# Altium PCB PCB_7000_0303_Rev13.PcbDoc (part 2 of 3)
Units mil, origin at the board's own origin, x right, y up, seen from the top; angles counter-clockwise.
Board outline 6252 x 3995 mil, 4 copper layers (Top Layer, Power, GND, Bottom Layer), stack 62.449 mil thick; 124 components, 105 nets, 610 pads, 262 vias.
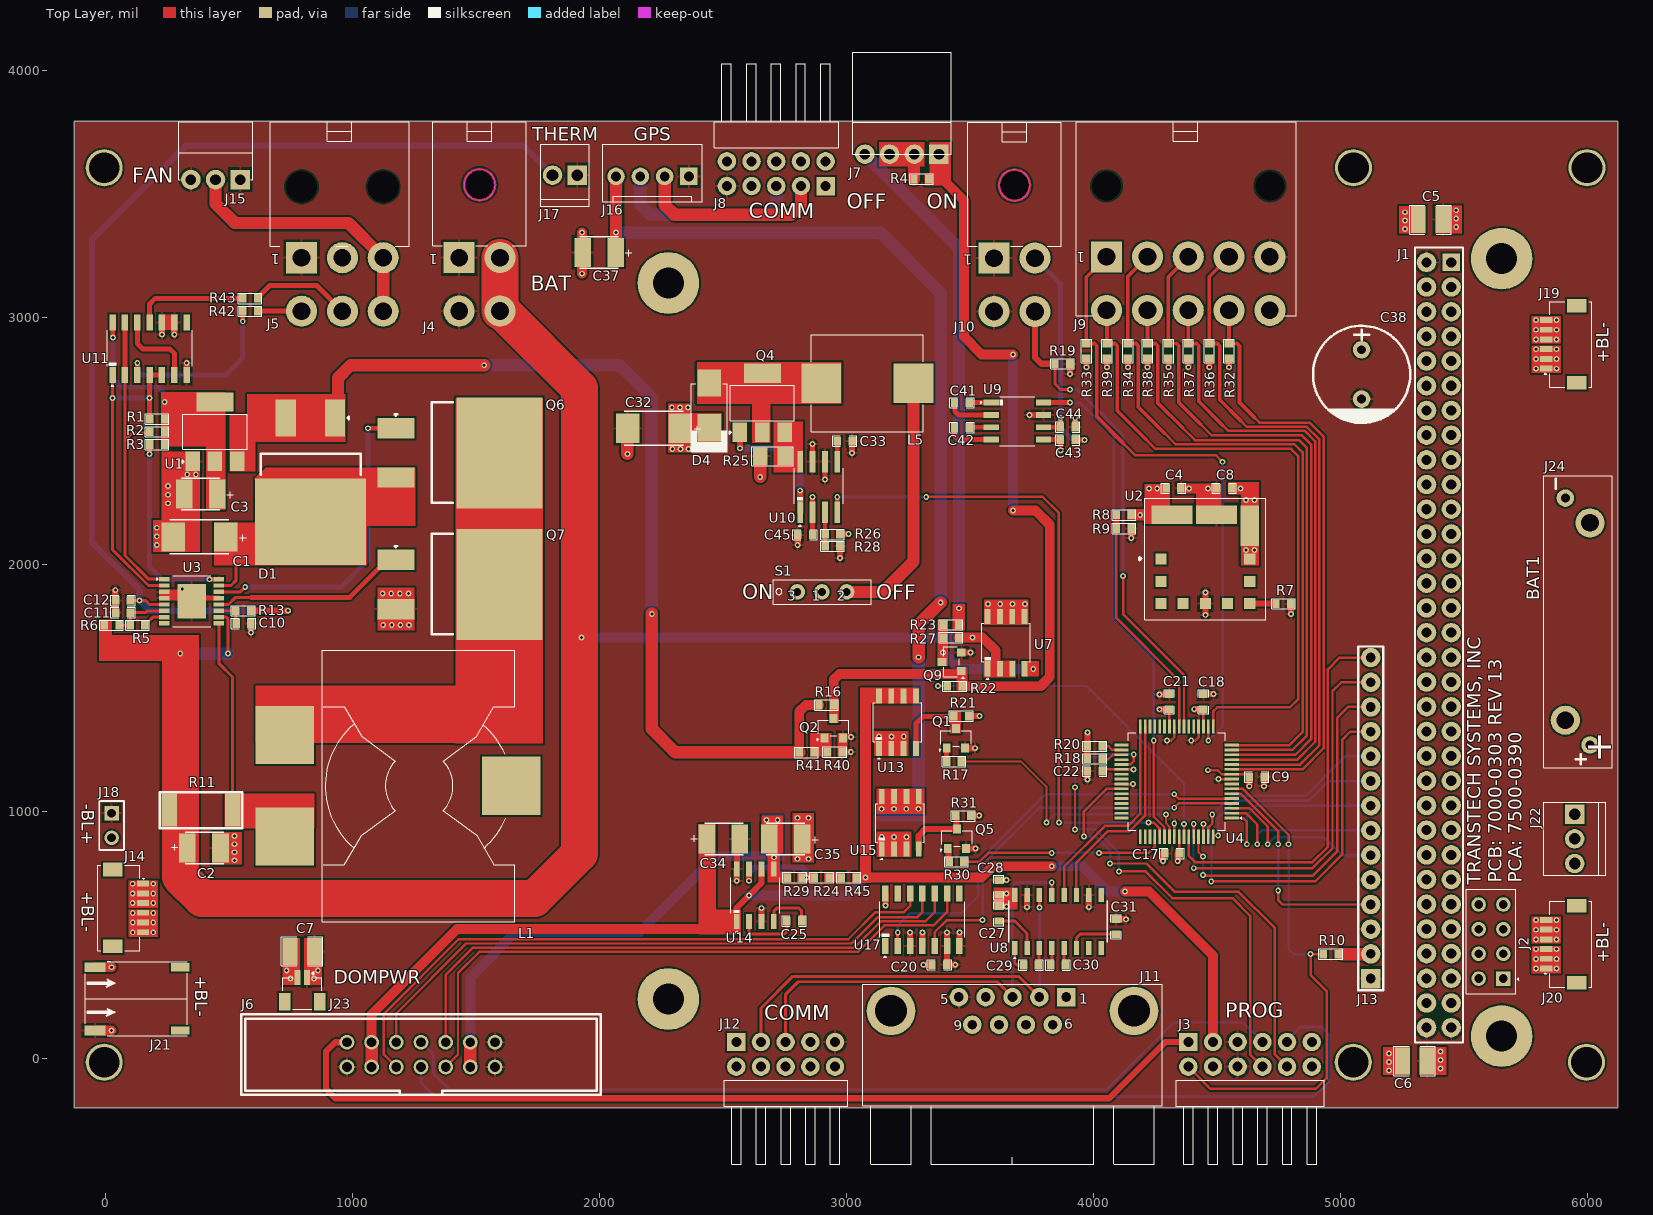
[diagram p0: Top Layer view]

## Part data (continued)
J14 J19 J20: "CONN HEADER SMD R/A 6POS 1MM", LCSC Part Number=C265110, Manufacturer=JST, Supplier Part Number=3248077, ComponentLink1Description=https://datasheet.ciiva.com/16213/sm06b-shls-tflfsn-16213701.pdf?src-supplier=Future+Electronics, ComponentLink1URL=https://datasheet.ciiva.com/16213/sm06b-shls-tflfsn-16213701.pdf?src-supplier=Future+Electronics, Item Type="Headers and Wire Housings", Manufacturer Part Number=SM06B-SHLS-TF(LF)(SN), Number of Contacts=6NUMBER, Pricing="4500=0.375 (USD)", RoHS=Yes, Stock=18000, Supplier="Future Electronics"
J15: "CONN HEADER R/A 3POS 2.54MM", Manufacturer=Molex, Supplier Part Number=538-22-05-3031, Item Type="Headers, Male Pins", Manufacturer Part Number=0022053031, Pricing="1=0.48, 10=0.423, 50=0.423, 100=0.349, 1000=0.25, 10000=0.205 (USD)", RoHS=Yes, Stock=22393, Supplier=Mouser
J16: "1x4P 1 2.54mm Male pin 4 -25℃~+85℃ 3A Straight Plugin,P=2.54mm Wire To Board / Wire To Wire Connector ROHS", LCSC Part Number=C2764792, Manufacturer=XFCN, Package=Plugin,P=2.54mm, ComponentLink1Description=LCSC, ComponentLink1URL=https://www.lcsc.com/product-detail/Wire-To-Board-Wire-To-Wire-Connector_XFCN-M2510V-04P_C2764792.html, Item Type="Wire To Board Connector", Manufacturer Part Number=M2510V-04P
J17: "CONN HEADER VERT 2POS 2.54MM", LCSC Part Number=C505162, Manufacturer=Molex, Supplier Part Number=538-22-11-2022, ComponentLink1Description=https://www.molex.com/pdm_docs/sd/022112022_sd.pdf?src-supplier=Digikey, ComponentLink1URL=https://www.molex.com/pdm_docs/sd/022112022_sd.pdf?src-supplier=Digikey, Item Type="Headers, Male Pins", Manufacturer Part Number=0022112022, Pricing="1=0.4, 10=0.274, 50=0.274, 100=0.216, 1000=0.177, 10000=0.169 (USD)", RoHS=Yes, Stock=67872, Supplier=Mouser
J18: "2.54mm Plugin 3A 2P Straight 1x2P 8.5mm Top Square Holes Plugin,P=2.54mm Female Headers ROHS", LCSC Part Number=C2935973, Manufacturer=DEALON, Package=Plugin,P=2.54mm, ComponentLink1Description=LCSC, ComponentLink1URL=https://www.lcsc.com/product-detail/span-style-background-color-ff0-Female-span-Headers_DEALON-DM254R-11-02-85_C2935973.html, Item Type=Header, Manufacturer Part Number=DM254R-11-02-85
J21: "CONN HEADER SMD R/A 2POS 3.5MM", LCSC Part Number=C485339, Manufacturer=JST, Supplier Part Number=5605704, ComponentLink1Description=https://datasheet.ciiva.com/26894/getdatasheetpartid-651429-26894666.pdf?src-supplier=Verical, ComponentLink1URL=https://datasheet.ciiva.com/26894/getdatasheetpartid-651429-26894666.pdf?src-supplier=Verical, ComponentLink2Description=https://datasheet.ciiva.com/16394/sm02b-bhss-1-tblfsn-16394674.pdf?src-supplier=Future+Electronics, ComponentLink2URL=https://datasheet.ciiva.com/16394/sm02b-bhss-1-tblfsn-16394674.pdf?src-supplier=Future+Electronics, Item Type="Headers and Wire Housings", Manufacturer Part Number=SM02B-BHSS-1-TB(LF)(SN), Pricing="1000=0.67, 2000=0.655, 3000=0.645, 4000=0.635 (USD)", RoHS=Yes, Stock=10000, Supplier="Future Electronics"
J22: "CONN HEADER VERT 3POS 2.54MM", LCSC Part Number=C505163, Manufacturer=Molex, Supplier Part Number=538-22-11-2032, ComponentLink1Description=https://www.molex.com/pdm_docs/sd/022112032_sd.pdf?src-supplier=Digikey, ComponentLink1URL=https://www.molex.com/pdm_docs/sd/022112032_sd.pdf?src-supplier=Digikey, Item Type="Headers, Male Pins", Manufacturer Part Number=0022112032, Pricing="1=0.68, 10=0.599, 50=0.599, 100=0.494, 1000=0.354, 10000=0.311 (USD)", RoHS=Yes, Stock=32037, Supplier=Mouser
J23: "CONN HEADER SMD 2POS 1MM", Housing Color=50Colour, LCSC Part Number=C160388, Manufacturer=JST, Supplier Part Number=9104290, ComponentLink1Description=https://datasheet.ciiva.com/8052/91630-8052077.pdf?src-supplier=Element14, ComponentLink1URL=https://datasheet.ciiva.com/8052/91630-8052077.pdf?src-supplier=Element14, ComponentLink2Description=https://datasheet.ciiva.com/16351/bm02b-srss-tb-lf-sn-16351949.pdf?src-supplier=Future+Electronics, ComponentLink2URL=https://datasheet.ciiva.com/16351/bm02b-srss-tb-lf-sn-16351949.pdf?src-supplier=Future+Electronics, Gender=29Gender, Housing Material=4261ConductorMaterial, Item Type=Connectors, Lead Free=5697LeadFree, Manufacturer Part Number=BM02B-SRSS-TB(LF)(SN), Orientation=5495OrientationType, Pricing="1=0.198 (USD)", RoHS=Yes, Stock=597, Supplier="Future Electronics"
J24: "Coin Cell Battery Holders VERT HOLDER FOR OR CR2477N", Manufacturer=Renata, Supplier Part Number=3698206, ComponentLink1Description=https://datasheet.ciiva.com/16990/nh5077-lf-16990158.pdf?src-supplier=Future+Electronics, ComponentLink1URL=https://datasheet.ciiva.com/16990/nh5077-lf-16990158.pdf?src-supplier=Future+Electronics, ComponentLink2Description=https://datasheet.ciiva.com/1391/35241-1391061.pdf?src-supplier=Element14, ComponentLink2URL=https://datasheet.ciiva.com/1391/35241-1391061.pdf?src-supplier=Element14, ComponentLink3Description=https://datasheet.ciiva.com/12342/nh5077-lf-29240-12342970.pdf?src-supplier=Mouser, ComponentLink3URL=https://datasheet.ciiva.com/12342/nh5077-lf-29240-12342970.pdf?src-supplier=Mouser, Item Type="Batteries and Accessories", Manufacturer Part Number=NH5077-LF, Pricing="50=1.72, 200=1.68, 750=1.63, 1500=1.61, 3750=1.56 (USD)", RoHS=Yes, Stock=477, Supplier="Future Electronics"
L1: "28A 4.7uH ±20% 61.2A 2.6mΩ SMD-3P,19.7x27.9mm Inductors (SMD) ROHS", LCSC Part Number=C2761984, Manufacturer=KOHERelec, Package=SMD-3P,19.7x27.9mm, ComponentLink1Description=LCSC, ComponentLink1URL=https://www.lcsc.com/product-detail/Inductors-SMD_KOHERelec-THC2818-4R7M_C2761984.html, Item Type=Inductors, Manufacturer Part Number=THC2818-4R7M
L5: library part SMMS1050-470M, "3A 47uH Molding Choke ±20% 4.5A SMD Power Inductors ROHS", LCSC Part Number=C149548, Manufacturer=SXN, ComponentLink1Description=LCSC, ComponentLink1URL=https://www.lcsc.com/product-detail/Power-Inductors_SXN-Shun-Xiang-Nuo-Elec-SMMS1050-470M_C149548.html, Manufacturer Part Number=SMMS1050-470M
Q1 Q2 Q5 Q9: "TRANS NPN 40V 0.6A SMD SOT23-3", Case/Package=SOT-23, Collector Base Voltage (VCBO)=75V, Collector Emitter Breakdown Voltage=40V, Collector Emitter Saturation Voltage=1V, Continuous Collector Current=600mA, Current=1A, Emitter Base Voltage (VEBO)=6V, Frequency=300MHz, LCSC Part Number=C94515, Manufacturer=Diodes, Max Operating Temperature=150°C, Max Power Dissipation=300mW, Min Operating Temperature=-55°C, Package Quantity=3000, Power Dissipation=350mW, Supplier Part Number 1=MMBT2222A-FDIDKR-ND, Collector Emitter Voltage (VCEO)=40V, ComponentLink1Description=http://www.diodes.com/datasheets/ds30041.pdf?src-supplier=Future+Electronics, ComponentLink1URL=http://www.diodes.com/datasheets/ds30041.pdf?src-supplier=Future+Electronics, ComponentLink2Description=http://www.diodes.com/datasheets/ds30041.pdf?src-supplier=Avnet, ComponentLink2URL=http://www.diodes.com/datasheets/ds30041.pdf?src-supplier=Avnet, ComponentLink3Description=https://www.verical.com/server-webapp/html/getDatasheet?partID=82692&src-supplier=Verical, ComponentLink3URL=https://www.verical.com/server-webapp/html/getDatasheet?partID=82692&src-supplier=Verical, ComponentLink4Description=https://www.diodes.com/assets/Datasheets/ds30041.pdf?src-supplier=Digi-Key, ComponentLink4URL=https://www.diodes.com/assets/Datasheets/ds30041.pdf?src-supplier=Digi-Key, ComponentLink5Description=http://www.diodes.com/datasheets/ds30041.pdf?src-supplier=Avnet+Europe, ComponentLink5URL=http://www.diodes.com/datasheets/ds30041.pdf?src-supplier=Avnet+Europe, ComponentLink6Description=http://www.diodes.com/datasheets/ds30041.pdf?src-supplier=Element14, ComponentLink6URL=http://www.diodes.com/datasheets/ds30041.pdf?src-supplier=Element14, Contact Plating=Matte,Tin, Current Rating=600mA, Element Configuration=Single, Gain Bandwidth Product=300MHz, Height=1mm, hFE Min=100, Item Type=Mosfet, Lead Free="Lead Free", Length=3.05mm, Manufacturer Part Number=MMBT2222A-7-F, Max Breakdown Voltage=40V, Max Collector Current=600mA, Max Frequency=300MHz, Mount="Surface Mount", Number of Elements=1, Number of Pins=3, Packaging="Tape and Reel", Polarity=NPN, Pricing 1="1=0.15, 10=0.134, 100=0.0729, 500=0.04486, 1000=0.03059 (USD)", Radiation Hardening=No, REACH SVHC="No SVHC", Stock 1=2471182, Supplier 1=Digi-Key, Termination=SMD/SMT, Transition Frequency=300MHz, Voltage=40V, Voltage Rating (DC)=40V, Weight=0.000282oz, Width=1.4mm
Q4: "60V 4A 1PCSNChannel SOT-223 MOSFETs ROHS", LCSC Part Number=C7494559, Manufacturer="VBsemi Elec", Package=SOT-223, ComponentLink1Description=LCSC, ComponentLink1URL=https://www.lcsc.com/product-detail/MOSFETs_VBsemi-Elec-NTF3055L175T1G-VB_C7494559.html, Item Type=MOSFET, Manufacturer Part Number=NTF3055L175T1G-VB
Q6: "MOSFET P-CH 60V 27A D2PAK", Manufacturer="ON Semiconductor / Fairchild", Supplier Part Number=FQB27P06TMCT-ND, ComponentLink1Description=https://datasheet.ciiva.com/6037/1781179-6037411.pdf?src-supplier=Farnell, ComponentLink1URL=https://datasheet.ciiva.com/6037/1781179-6037411.pdf?src-supplier=Farnell, ComponentLink2Description=https://datasheet.ciiva.com/15137/getdatasheetpartid-95969-15137803.pdf?src-supplier=Verical, ComponentLink2URL=https://datasheet.ciiva.com/15137/getdatasheetpartid-95969-15137803.pdf?src-supplier=Verical, ComponentLink3Description=https://datasheet.ciiva.com/4441/fqb27p06-109865-4441954.pdf?src-supplier=Mouser, ComponentLink3URL=https://datasheet.ciiva.com/4441/fqb27p06-109865-4441954.pdf?src-supplier=Mouser, ComponentLink4Description=https://datasheet.ciiva.com/1256/1729188-1256195.pdf?src-supplier=Newark, ComponentLink4URL=https://datasheet.ciiva.com/1256/1729188-1256195.pdf?src-supplier=Newark, ComponentLink5Description=https://datasheet.ciiva.com/6382/fqb27p06-6382008.pdf?src-supplier=Digikey, ComponentLink5URL=https://datasheet.ciiva.com/6382/fqb27p06-6382008.pdf?src-supplier=Digikey, ComponentLink6Description=https://datasheet.ciiva.com/6382/fqb27p06-6382011.pdf?src-supplier=Digikey, ComponentLink6URL=https://datasheet.ciiva.com/6382/fqb27p06-6382011.pdf?src-supplier=Digikey, ComponentLink7Description=https://datasheet.ciiva.com/22671/1781179-22671975.pdf?src-supplier=Element14, ComponentLink7URL=https://datasheet.ciiva.com/22671/1781179-22671975.pdf?src-supplier=Element14, Item Type=MOSFETs, Manufacturer Part Number=FQB27P06TM, Pricing="1=1.97, 10=1.634, 100=1.3003 (USD)", RoHS=Yes, Stock=2039, Supplier=Digikey
Q7: "MOSFET N-CH 60V 50A D2PAK", Current Rating=50A, LCSC Part Number=C472532, Manufacturer=STMicroelectronics, Supplier Part Number=511-STB55NF06, Voltage Rating (DC)=60V, ComponentLink1Description=https://datasheet.ciiva.com/4441/cd00002311-107743-4441381.pdf?src-supplier=Mouser, ComponentLink1URL=https://datasheet.ciiva.com/4441/cd00002311-107743-4441381.pdf?src-supplier=Mouser, ComponentLink2Description=https://datasheet.ciiva.com/17097/stb55nf06t4-17097567.pdf?src-supplier=Allied+Electronics, ComponentLink2URL=https://datasheet.ciiva.com/17097/stb55nf06t4-17097567.pdf?src-supplier=Allied+Electronics, ComponentLink3Description=https://datasheet.ciiva.com/16383/cd00002311-16383630.pdf?src-supplier=Future+Electronics, ComponentLink3URL=https://datasheet.ciiva.com/16383/cd00002311-16383630.pdf?src-supplier=Future+Electronics, ComponentLink4Description=https://datasheet.ciiva.com/938/cd00002311-938375.pdf?src-supplier=Digikey, ComponentLink4URL=https://datasheet.ciiva.com/938/cd00002311-938375.pdf?src-supplier=Digikey, ComponentLink5Description=https://datasheet.ciiva.com/938/cd00002311-938376.pdf?src-supplier=Digikey, ComponentLink5URL=https://datasheet.ciiva.com/938/cd00002311-938376.pdf?src-supplier=Digikey, Item Type=MOSFETs, Lead Free=5697LeadFree, Manufacturer Part Number=STB55NF06T4, Pricing="1=2.35, 10=1.97, 50=1.97, 100=1.58, 1000=1.1, 10000=1.05 (USD)", RoHS=Yes, Stock=5248, Supplier=Mouser
R1 R2 R3 R5 R8 R10 R13 R16 R21 R27 R28 R31 R32 R33 R34 R35 R36 R37 R38 R39 R40 R41 R45: library part RT0603BRD0710KL, "RES SMD 10K OHM 0.1% 1/10W 0603", Case/Package=0603, LCSC Part Number=C95204, Manufacturer=Yageo, Max Operating Temperature=155°C, Min Operating Temperature=-55°C, Package Height=0.45mm, Package Length=1.6mm, Package Style=SMTMeter, Package Width=0.8mm, Power=100mW, Rated Temperature=70°C, Resistor Type="FIXED RESISTOR", Supplier Part Number 1=1991391P, Temperature Coefficient=25ppm/°C, Tolerance=0.1%, Working Voltage=75V, Category="Chip SMD Resistors", ComponentLink1Description=https://datasheet.ciiva.com:443/pdfs/VipMasterIC/IC/YAGO/YAGO-S-A0008510989/YAGO-S-A0008510989-1.pdf?src-supplier=IHS+Markit, ComponentLink1URL=https://datasheet.ciiva.com:443/pdfs/VipMasterIC/IC/YAGO/YAGO-S-A0008510989/YAGO-S-A0008510989-1.pdf?src-supplier=IHS+Markit, ComponentLink2Description=https://datasheet.ciiva.com/5624/pyu-rt-1-to-0-05-rohs-l-4-5624351.pdf?src-supplier=Mouser, ComponentLink2URL=https://datasheet.ciiva.com/5624/pyu-rt-1-to-0-05-rohs-l-4-5624351.pdf?src-supplier=Mouser, ComponentLink3Description=https://datasheet.ciiva.com/29721/pyu-rt-1-to-0-05-rohs-l-4-29721177.pdf?src-supplier=Digi-Key, ComponentLink3URL=https://datasheet.ciiva.com/29721/pyu-rt-1-to-0-05-rohs-l-4-29721177.pdf?src-supplier=Digi-Key, Construction=Chip, Item Type=Resistor, Manufacturer Part Number=RT0603BRD0710KL, Mounting Technology="Surface Mount", Packaging="Tape and Reel", Pins=2, Pricing 1="100=0.29800, 250=0.27800, 500=0.25900, 1000=0.23700 (GBP)", Reach SVHC Compliant=Yes, RoHS=Yes, RoHS Compliant=Yes, Stock 1=20510, Supplier 1=Rs, Technology="THIN FILM", Termination=Wraparound
R4 R17 R18 R20 R22 R23 R30: library part RC0603FR-071KL, "RES SMD 1K OHM 1% 1/10W 0603", Case Code (Imperial)=0603, Case Code (Metric)=1608, LCSC Part Number=C22548, Manufacturer=Yageo, Max Operating Temperature=155°C, Min Operating Temperature=-55°C, Power Rating=100mW, Resistance=1kR, Supplier Part Number 1=311-1.00KHRDKR-ND, Temperature Coefficient=100ppm/°C, Tolerance=1%, Voltage Rating=50V, Case/Package=0603, ComponentLink1Description=https://www.verical.com/server-webapp/html/getDatasheet?partID=409289&src-supplier=Verical, ComponentLink1URL=https://www.verical.com/server-webapp/html/getDatasheet?partID=409289&src-supplier=Verical, ComponentLink2Description=http://documents.rs-components.com/techlib://itc_doclist_GB.htm?stockno=5048928&src-supplier=RSComponents, ComponentLink2URL=http://documents.rs-components.com/techlib://itc_doclist_GB.htm?stockno=5048928&src-supplier=RSComponents, ComponentLink3Description=http://www.yageo.com/documents/recent/PYu-RC0603_51_RoHS_L_4.pdf?src-supplier=Avnet+Europe, ComponentLink3URL=http://www.yageo.com/documents/recent/PYu-RC0603_51_RoHS_L_4.pdf?src-supplier=Avnet+Europe, ComponentLink4Description=http://www.farnell.com/datasheets/2167052.pdf?src-supplier=Element14, ComponentLink4URL=http://www.farnell.com/datasheets/2167052.pdf?src-supplier=Element14, ComponentLink5Description=http://www.farnell.com/datasheets/1868787.pdf?src-supplier=Element14, ComponentLink5URL=http://www.farnell.com/datasheets/1868787.pdf?src-supplier=Element14, ComponentLink6Description=http://www.yageo.com/documents/recent/PYu-RC_Group_51_RoHS_L_2.pdf?src-supplier=Avnet, ComponentLink6URL=http://www.yageo.com/documents/recent/PYu-RC_Group_51_RoHS_L_2.pdf?src-supplier=Avnet, ComponentLink7Description=https://www.verical.com/server-webapp/html/getDatasheet?partID=404327&src-supplier=Verical, ComponentLink7URL=https://www.verical.com/server-webapp/html/getDatasheet?partID=404327&src-supplier=Verical, ComponentLink8Description=http://www.farnell.com/datasheets/443971.pdf?src-supplier=Element14, ComponentLink8URL=http://www.farnell.com/datasheets/443971.pdf?src-supplier=Element14, Composition="Thick Film", Contact Plating=Tin,Matte, Depth=0.8mm, Height=0.45mm, Item Type=Resistor, Lead Free="Lead Free", Length=1.6mm, Manufacturer Part Number=RC0603FR-071KL, Military Standard=Not, Packaging="Tape and Reel", Pricing 1="1=0.1, 10=0.023, 100=0.0094, 1000=0.0042, 2500=0.0037 (USD)", Radiation Hardening=No, REACH SVHC="No SVHC", Stock 1=21472395, Supplier 1=Digi-Key, Termination=SMD/SMT
R6: library part RC0603FR-0749K9L, "RES 49.9K OHM 1% 1/10W 0603", Case Code (Imperial)=0603, Case Code (Metric)=1608, LCSC Part Number=C114624, Manufacturer=Yageo, Max Operating Temperature=155°C, Max Power Dissipation=100mW, Min Operating Temperature=-55°C, Package Quantity=1, Resistance=49.9kR, Resistor Type="Thick Film", Supplier Part Number 1=311-49.9KHRCT-ND, Temperature Coefficient=100ppm/°C, Tolerance=1%, Voltage Rating=50V, Case/Package=0603, Category="Chip SMD Resistors", ComponentLink1Description=https://datasheet.ciiva.com/2454/pyu-r-int-thick-7-2454042.pdf?src-supplier=Digi-Key, ComponentLink1URL=https://datasheet.ciiva.com/2454/pyu-r-int-thick-7-2454042.pdf?src-supplier=Digi-Key, ComponentLink2Description=https://datasheet.ciiva.com/2454/pyu-r-int-thick-7-2454043.pdf?src-supplier=Digi-Key, ComponentLink2URL=https://datasheet.ciiva.com/2454/pyu-r-int-thick-7-2454043.pdf?src-supplier=Digi-Key, ComponentLink3Description=https://datasheet.ciiva.com/2454/pyu-r-int-thick-7-2454044.pdf?src-supplier=Digi-Key, ComponentLink3URL=https://datasheet.ciiva.com/2454/pyu-r-int-thick-7-2454044.pdf?src-supplier=Digi-Key, ComponentLink4Description=https://datasheet.ciiva.com/15189/getdatasheetpartid-323805-15189749.pdf?src-supplier=Verical, ComponentLink4URL=https://datasheet.ciiva.com/15189/getdatasheetpartid-323805-15189749.pdf?src-supplier=Verical, Construction=Rectangular, Depth=0.8mm, Features="Moisture Resistant", Height=0.022inch, Item Type=Resistor, Lead Free="Lead Free", Length=0.063inch, Manufacturer Part Number=RC0603FR-0749K9L, Military Standard=Not, Mount="Surface Mount", Number of Terminations=2, Packaging="Tape and Reel", Power Rating=100mW, Pricing 1="1=0.10000, 10=0.02400, 100=0.00970, 1000=0.00436, 2500=0.00378 (USD)", RoHS=Yes, RoHS Compliant=Yes, Series=RC, Size Code=0603, Stock 1=77863, Supplier 1=Digi-Key, Termination=SMD/SMT, Voltage Rating (DC)=50V, Width=0.031inch
R7: library part 0603WAF1301T5E, "100mW Thick Film Resistors 75V ±100ppm/℃ ±1% 1.3kΩ 0603 Chip Resistor - Surface Mount ROHS", LCSC Part Number=C22767, Manufacturer=UNI-ROYAL, Package=0603, ComponentLink1Description=LCSC, ComponentLink1URL=https://www.lcsc.com/product-detail/Chip-Resistor-Surface-Mount_UNI-ROYAL-Uniroyal-Elec-0603WAF1301T5E_C22767.html, Item Type=Resistor, Manufacturer Part Number=0603WAF1301T5E
R9: library part 0603WAF4991T5E, "100mW Thick Film Resistors ±100ppm/℃ ±1% 1MΩ 0603 Chip Resistor - Surface Mount ROHS", LCSC Part Number=C23046, Manufacturer="UNI-ROYAL(Uniroyal Elec)", Package=0603, ComponentLink1Description=LCSC, ComponentLink1URL=https://www.lcsc.com/product-detail/Chip-Resistor-Surface-Mount_UNI-ROYAL-Uniroyal-Elec-0603WAF4991T5E_C23046.html, Item Type=Resistor, Manfacturer Part Number=0603WAF4991T5E
R11: library part WSL2512R0250FEA, "RES 0.025 OHM 1% 1W 2512", Case Code (Imperial)=2512, Case Code (Metric)=6432, Manufacturer="Vishay Dale", Max Operating Temperature=170°C, Max Power Dissipation=1W, Min Operating Temperature=-65°C, Package Quantity=2000, Resistance Tolerance=1%, Resistor Type="Metal Strip", Supplier Part Number=71-WSL2512R0250FEA, Temperature Coefficient=75ppm/°C, Voltage Rating=150mV, Case/Package=2512, ComponentLink1Description=https://datasheet.ciiva.com/11811/0900766b80d81e3e-11811295.pdf?src-supplier=Rs, ComponentLink1URL=https://datasheet.ciiva.com/11811/0900766b80d81e3e-11811295.pdf?src-supplier=Rs, ComponentLink2Description=https://datasheet.ciiva.com/6088/wsl-6088905.pdf?src-supplier=Farnell, ComponentLink2URL=https://datasheet.ciiva.com/6088/wsl-6088905.pdf?src-supplier=Farnell, ComponentLink3Description=https://datasheet.ciiva.com/9024/wsl-9024744.pdf?src-supplier=Avnet, ComponentLink3URL=https://datasheet.ciiva.com/9024/wsl-9024744.pdf?src-supplier=Avnet, ComponentLink4Description=https://datasheet.ciiva.com/22675/wsl-22675150.pdf?src-supplier=Element14, ComponentLink4URL=https://datasheet.ciiva.com/22675/wsl-22675150.pdf?src-supplier=Element14, ComponentLink5Description=https://datasheet.ciiva.com/16768/70201098-16768106.pdf?src-supplier=Allied+Electronics, ComponentLink5URL=https://datasheet.ciiva.com/16768/70201098-16768106.pdf?src-supplier=Allied+Electronics, ComponentLink6Description=https://datasheet.ciiva.com/7702/442550-7702460.pdf?src-supplier=Element14, ComponentLink6URL=https://datasheet.ciiva.com/7702/442550-7702460.pdf?src-supplier=Element14, ComponentLink7Description=https://datasheet.ciiva.com/7702/442550-7702461.pdf?src-supplier=Element14, ComponentLink7URL=https://datasheet.ciiva.com/7702/442550-7702461.pdf?src-supplier=Element14, ComponentLink8Description=https://datasheet.ciiva.com/9024/wsl-9024767.pdf?src-supplier=Avnet, ComponentLink8URL=https://datasheet.ciiva.com/9024/wsl-9024767.pdf?src-supplier=Avnet, Contact Plating=Tin,Matte, Depth=3.18mm, Features="Moisture Resistant,Automotive AEC-Q200,Anti-Sulfur", Height=0.635mm, Item Type=Resistor, Lead Free="Lead Free", Length=6.4mm, Manufacturer Part Number=WSL2512R0250FEA, Number of Terminations=2, Packaging="Tape and Reel", Pins=2, Power Rating=1W, Pricing="1=0.58, 10=0.371, 50=0.371, 100=0.289, 1000=0.267, 10000=0.267 (USD)", Radiation Hardening=No, Reach SVHC Compliant=No, RoHS=No, RoHS Compliant=No, Series=WSL, Stock=279245, Supplier=Mouser, Technology="METAL STRIP", Termination=SMD/SMT, Tolerance=1%, Weight=0.002243oz, Width=3.2mm
R19: library part 0603WAF1004T5E, "100mW Thick Film Resistors ±100ppm/℃ ±1% 1MΩ 0603 Chip Resistor - Surface Mount ROHS", LCSC Part Number=C22935, Manufacturer="UNI-ROYAL(Uniroyal Elec)", Package=0603, Item Type=Resistor, Manfacturer Part Number=0603WAF1004T5E
R24 R29: library part RC0603JR-07100KL, "RES 100K OHM 5% 1/10W 0603", Case Code (Imperial)=0603, Case Code (Metric)=1608, LCSC Part Number=C100048, Manufacturer=Yageo, Max Operating Temperature=155°C, Max Power Dissipation=100mW, Min Operating Temperature=-55°C, Resistance=100kR, Resistance Tolerance=5%, Resistor Type="Thick Film", Supplier Part Number 1=311-100KGRCT-ND, Temperature Coefficient=100ppm/°C, Voltage Rating=50V, Case/Package=0603, Category="Chip SMD Resistors", ComponentLink1Description=https://datasheet.ciiva.com/7746/443971-7746424.pdf?src-supplier=Element14, ComponentLink1URL=https://datasheet.ciiva.com/7746/443971-7746424.pdf?src-supplier=Element14, ComponentLink2Description=https://datasheet.ciiva.com/7983/443971-7983686.pdf?src-supplier=Element14, ComponentLink2URL=https://datasheet.ciiva.com/7983/443971-7983686.pdf?src-supplier=Element14, ComponentLink3Description=https://datasheet.ciiva.com/7746/443971-7746423.pdf?src-supplier=Element14, ComponentLink3URL=https://datasheet.ciiva.com/7746/443971-7746423.pdf?src-supplier=Element14, ComponentLink4Description=https://datasheet.ciiva.com/8887/pyu-rc0603-51-rohs-l-4-8887903.pdf?src-supplier=Avnet, ComponentLink4URL=https://datasheet.ciiva.com/8887/pyu-rc0603-51-rohs-l-4-8887903.pdf?src-supplier=Avnet, Contact Plating=Tin,Matte, Features="Moisture Resistant", Item Type=Resistor, Lead Free="Lead Free", Manufacturer Part Number=RC0603JR-07100KL, Number of Pins=2, Number of Terminations=2, Packaging="Tape and Reel", Power Rating=100mW, Pricing 1="1=0.10000, 10=0.02000, 100=0.00800, 1000=0.00360, 2500=0.00312 (USD)", Radiation Hardening=No, REACH SVHC="No SVHC", RoHS=Yes, RoHS Compliant=Yes, Series=RC, Size Code=0603, Stock 1=1210037, Supplier 1=Digi-Key, Termination=SMD/SMT, Tolerance=5%, Voltage Rating (DC)=50V, Width=0.8mm
R25: library part LR1206-21R040F4, "1W 40mΩ Surface Mount Current Sensing Resistors ±50ppm/℃ ±1% 1206 Current Sense Resistors/Shunt Resistors ROHS", LCSC Part Number=C2681030, Manufacturer=RALEC, Package=1206, ComponentLink1Description=LCSC, ComponentLink1URL=https://www.lcsc.com/product-detail/Current-Sense-Resistors-Shunt-Resistors_RALEC-LR1206-21R040F4_C2681030.html, Item Type=Resistor, Manufacturer Part Number=LR1206-21R040F4
R26: library part RC0603FR-0756KL, "RES 56K OHM 1% 1/10W 0603", Case Code (Imperial)=0603, Case Code (Metric)=1608, LCSC Part Number=C114630, Manufacturer=Yageo, Max Operating Temperature=155°C, Max Power Dissipation=100mW, Min Operating Temperature=-55°C, Package Quantity=1, Resistance=56kR, Resistance Tolerance=1%, Resistor Type="Thick Film", Supplier Part Number 1=1995607, Temperature Coefficient=100ppm/°C, Voltage Rating=75V, Voltage Rating (DC)=50V, Case/Package=0603, Category="Chip SMD Resistors", ComponentLink1Description=https://datasheet.ciiva.com/2508/pyu-r-int-thick-7-2508519.pdf?src-supplier=Digi-Key, ComponentLink1URL=https://datasheet.ciiva.com/2508/pyu-r-int-thick-7-2508519.pdf?src-supplier=Digi-Key, ComponentLink2Description=https://datasheet.ciiva.com/2508/pyu-r-int-thick-7-2508520.pdf?src-supplier=Digi-Key, ComponentLink2URL=https://datasheet.ciiva.com/2508/pyu-r-int-thick-7-2508520.pdf?src-supplier=Digi-Key, ComponentLink3Description=https://datasheet.ciiva.com/2508/pyu-r-int-thick-7-2508518.pdf?src-supplier=Digi-Key, ComponentLink3URL=https://datasheet.ciiva.com/2508/pyu-r-int-thick-7-2508518.pdf?src-supplier=Digi-Key, ComponentLink4Description=https://datasheet.ciiva.com/7746/443971-7746377.pdf?src-supplier=Element14, ComponentLink4URL=https://datasheet.ciiva.com/7746/443971-7746377.pdf?src-supplier=Element14, ComponentLink5Description=https://datasheet.ciiva.com/7746/443971-7746376.pdf?src-supplier=Element14, ComponentLink5URL=https://datasheet.ciiva.com/7746/443971-7746376.pdf?src-supplier=Element14, ComponentLink6Description=https://datasheet.ciiva.com/15189/getdatasheetpartid-329310-15189781.pdf?src-supplier=Verical, ComponentLink6URL=https://datasheet.ciiva.com/15189/getdatasheetpartid-329310-15189781.pdf?src-supplier=Verical, Construction=Rectangular, Depth=0.8mm, Features="Moisture Resistant", Height=0.022inch, Lead Free="Lead Free", Length=1.6mm, Manufacturer Part Number=RC0603FR-0756KL, Military Standard=Not, Number of Pins=2, Number of Terminations=2, Package=0603, Packaging="Tape and Reel", Power Rating=100mW, Pricing 1="100=0.01300, 500=0.01200, 1000=0.01100, 2500=0.01000, 5000=0.00900 (GBP)", Reach SVHC Compliant=Unknown, RoHS=Yes, RoHS Compliant=Yes, Series=RC, Size Code=0603, Stock 1=15000, Supplier 1=RSComponents, Termination=SMD/SMT, Tolerance=1%, Weight=7.1E-05oz, Width=0.8mm
R42 R43: library part RC0603FR-07100RL, "RES SMD 100 OHM 1% 1/10W 0603", Case Code (Imperial)=0603, Case Code (Metric)=1608, LCSC Part Number=C105588, Manufacturer=Yageo, Max Operating Temperature=155°C, Max Power Dissipation=100mW, Min Operating Temperature=-55°C, Resistance Tolerance=1%, Resistor Type="Thick Film", Temperature Coefficient=100ppm/°C, Voltage Rating=50V, Case/Package=0603, Category="Chip SMD Resistors", Construction=Rectangular, Depth=0.8mm, Features="Moisture Resistant", Height=0.45mm, Item Type=Resistor, Lead Free="Lead Free", Length=1.6mm, Manufacturer Part Number=RC0603FR-07100RL, Military Standard=Not, Number of Pins=2, Number of Terminations=2, Packaging="Tape and Reel", Power Rating=100mW, Pricing 1="5000=0.00300, 5000=0.00200, 5000=0.00450, 50000=0.00410, 500000=0.00230, 2500000=0.00140 (USD)", REACH SVHC=Unknown, Resistance=100R, RoHS=Yes, RoHS Compliant=Yes, Series=RC, Size Code=0603, Stock 1=3800000, Supplier 1="Arrow Electronics", Supplier Part Number 1=RC0603FR-07100RL, Technology="THICK FILM", Termination=SMD/SMT, Tolerance=1%, Voltage Rating (DC)=50V, Width=0.8mm
S1: "SWITCH SLIDE SPDT 500MA 12V", Manufacturer="NKK Switches", Supplier Part Number=360-2920-ND, ComponentLink1Description=https://datasheet.ciiva.com/5279/smslides-23398-5279864.pdf?src-supplier=Mouser, ComponentLink1URL=https://datasheet.ciiva.com/5279/smslides-23398-5279864.pdf?src-supplier=Mouser, ComponentLink2Description=https://datasheet.ciiva.com/28378/1783589-28378567.pdf?src-supplier=Element14, ComponentLink2URL=https://datasheet.ciiva.com/28378/1783589-28378567.pdf?src-supplier=Element14, ComponentLink3Description=https://datasheet.ciiva.com/16359/msnonilluminated-16359931.pdf?src-supplier=Future+Electronics, ComponentLink3URL=https://datasheet.ciiva.com/16359/msnonilluminated-16359931.pdf?src-supplier=Future+Electronics, Item Type="Slide Switches", Manufacturer Part Number=SM0320102, Pricing="1=4.7, 10=4.507, 25=4.1148, 100=3.5661, 250=3.233, 500=2.99788, 1000=2.78235, 2500=2.52762 (USD)", RoHS=Yes, Stock=1371, Supplier=Digikey
U1: "75dB@(120Hz) 1A Fixed 5V Positive electrode 12V SOT-223-3 Linear Voltage Regulators (LDO) ROHS", LCSC Part Number=C126028, Manufacturer="HTC Korea TAEJIN Tech", Package=SOT-223-3, ComponentLink1Description=LCSC, ComponentLink1URL=https://www.lcsc.com/product-detail/Linear-Voltage-Regulators-LDO_HTC-Korea-TAEJIN-Tech-LM1117S-5-0_C126028.html, Item Type=LDO, Manufacturer Part Number=LM1117S-5.0
U2: "DC DC CONVERTER 0.591-5.5V 30W", Manufacturer=Murata, Supplier Part Number=811-3015-1-ND, ComponentLink1Description=https://datasheet.ciiva.com/4644/okl-t6-w12-21493-4644197.pdf?src-supplier=Mouser, ComponentLink1URL=https://datasheet.ciiva.com/4644/okl-t6-w12-21493-4644197.pdf?src-supplier=Mouser, Item Type="Board Mount Modules", Manufacturer Part Number=OKL-T/6-W12P-C, Pricing="1=6.48, 5=6.39, 10=6.298, 25=6.1128, 50=5.9274, 100=5.7423 (USD)", RoHS=Yes, Stock=5709, Supplier=Digikey
U3: "IC BATT CHG MULTI 1-16C 16TSSOP", Case/Package=TSSOP, Manufacturer="Analog Devices / Linear Technology", Max Charge Current=4A, Max Operating Temperature=85°C, Max Output current=2A, Max Output Voltage=4.8V, Max Supply Voltage=34V, Min Input Voltage=4.5V, Min Operating Temperature=0°C, Package Quantity=95, Supplier Part Number=584-LTC4010CFE#PBF, ComponentLink1Description=https://datasheet.ciiva.com/14093/drlinear-batterie-lade-ic-ltc14010-en-14093937.pdf?src-supplier=Distrelec, ComponentLink1URL=https://datasheet.ciiva.com/14093/drlinear-batterie-lade-ic-ltc14010-en-14093937.pdf?src-supplier=Distrelec, ComponentLink2Description=https://datasheet.ciiva.com/25627/0900766b810edb64-25627723.pdf?src-supplier=Rs, ComponentLink2URL=https://datasheet.ciiva.com/25627/0900766b810edb64-25627723.pdf?src-supplier=Rs, ComponentLink3Description=https://datasheet.ciiva.com/15114/getdatasheetpartid-136155-15114456.pdf?src-supplier=Verical, ComponentLink3URL=https://datasheet.ciiva.com/15114/getdatasheetpartid-136155-15114456.pdf?src-supplier=Verical, ComponentLink4Description=https://datasheet.ciiva.com/19478/1759060-19478598.pdf?src-supplier=Jameco, ComponentLink4URL=https://datasheet.ciiva.com/19478/1759060-19478598.pdf?src-supplier=Jameco, ComponentLink5Description=https://datasheet.ciiva.com/1934/6917-1934212.pdf?src-supplier=Digikey, ComponentLink5URL=https://datasheet.ciiva.com/1934/6917-1934212.pdf?src-supplier=Digikey, ComponentLink6Description=https://datasheet.ciiva.com/1490/1675706-1490082.pdf?src-supplier=Element14, ComponentLink6URL=https://datasheet.ciiva.com/1490/1675706-1490082.pdf?src-supplier=Element14, ComponentLink7Description=https://datasheet.ciiva.com/1137/1675706-1137371.pdf?src-supplier=Element14, ComponentLink7URL=https://datasheet.ciiva.com/1137/1675706-1137371.pdf?src-supplier=Element14, ComponentLink8Description=https://datasheet.ciiva.com/1139/1675706-1139885.pdf?src-supplier=Farnell, ComponentLink8URL=https://datasheet.ciiva.com/1139/1675706-1139885.pdf?src-supplier=Farnell, ComponentLink9Description=https://datasheet.ciiva.com/1496/1675706-1496804.pdf?src-supplier=Farnell, ComponentLink9URL=https://datasheet.ciiva.com/1496/1675706-1496804.pdf?src-supplier=Farnell, Height=0.95mm, Item Type=IC, Lead Free="Lead Free", Length=5.1mm, Manufacturer Part Number=LTC4010CFE#PBF, Min Output Voltage=4.5V, Min Supply Voltage=4.5V, Number of Cells=16, Packaging=Rail/Tube, Pins=16, Pricing="1=11.41, 10=10.48, 50=10.05, 100=8.65, 1000=7.22, 10000=7.21 (USD)", Radiation Hardening=No, Reach SVHC Compliant=No, RoHS=Yes, RoHS Compliant=Yes, Series=-, Stock=18708, Supplier=Mouser, Termination=SMD/SMT, Width=4.5mm
U4: "IC MCU 8BIT 96KB FLASH 64TQFP", Manufacturer=Microchip, Supplier Part Number=PIC18F6627-I/PT-ND, ComponentLink1Description=https://datasheet.ciiva.com/7774/39646c-7774478.pdf?src-supplier=Element14, ComponentLink1URL=https://datasheet.ciiva.com/7774/39646c-7774478.pdf?src-supplier=Element14, ComponentLink2Description=https://datasheet.ciiva.com/7774/39646c-7774479.pdf?src-supplier=Element14, ComponentLink2URL=https://datasheet.ciiva.com/7774/39646c-7774479.pdf?src-supplier=Element14, ComponentLink3Description=https://datasheet.ciiva.com/9236/39646c-9236634.pdf?src-supplier=Avnet, ComponentLink3URL=https://datasheet.ciiva.com/9236/39646c-9236634.pdf?src-supplier=Avnet, ComponentLink4Description=https://datasheet.ciiva.com/6132/62310-6132869.pdf?src-supplier=Farnell, ComponentLink4URL=https://datasheet.ciiva.com/6132/62310-6132869.pdf?src-supplier=Farnell, ComponentLink5Description=https://datasheet.ciiva.com/6132/652299-6132870.pdf?src-supplier=Farnell, ComponentLink5URL=https://datasheet.ciiva.com/6132/652299-6132870.pdf?src-supplier=Farnell, ComponentLink6Description=https://datasheet.ciiva.com/41453/001084362-da-01-en-ic-pic-mcu-f-pic18f6627-i-pt-tqfp-64-mcp-41453830.pdf?src-supplier=Conrad, ComponentLink6URL=https://datasheet.ciiva.com/41453/001084362-da-01-en-ic-pic-mcu-f-pic18f6627-i-pt-tqfp-64-mcp-41453830.pdf?src-supplier=Conrad, Item Type=IC, Manufacturer Part Number=PIC18F6627-I/PT, Pricing="1=11.3 (USD)", RoHS=Yes, Stock=1660, Supplier=Digikey
U7 U13 U15: "SOIC-8 MOSFETs ROHS", LCSC Part Number=C5122021, Manufacturer="TECH PUBLIC", Package=SOIC-8, ComponentLink1Description=LCSC, ComponentLink1URL=https://www.lcsc.com/product-detail/MOSFETs_TECH-PUBLIC-FDS4435A_C5122021.html, Item Type=Mosfet, Manufacturer Part Number=FDS4435A
U8: "140Kbps transceiver SOP-16 RS232 ICs ROHS", LCSC Part Number=C519083, Manufacturer=HGSEMI, Package=SOP-16, ComponentLink1Description=LCSC, ComponentLink1URL=https://www.lcsc.com/product-detail/RS-span-style-background-color-ff0-232-span-ICs_HGSEMI-MAX232EIM-TR_C519083.html, Item Type=IC, Manufacturer Part Number=MAX232EIM/TR
U9: "IC REG CHRG PUMP 12V 30MA 8SOIC", LCSC Part Number=C2976348, Manufacturer=Maxim, Supplier Part Number=700-MAX662AESAT, ComponentLink1Description=https://datasheet.ciiva.com/3216/max662a-3216150.pdf?src-supplier=Avnet, ComponentLink1URL=https://datasheet.ciiva.com/3216/max662a-3216150.pdf?src-supplier=Avnet, ComponentLink2Description=https://datasheet.ciiva.com/3216/max662a-3216729.pdf?src-supplier=Avnet, ComponentLink2URL=https://datasheet.ciiva.com/3216/max662a-3216729.pdf?src-supplier=Avnet, ComponentLink3Description=https://datasheet.ciiva.com/2037/max662a-2037379.pdf?src-supplier=Digikey, ComponentLink3URL=https://datasheet.ciiva.com/2037/max662a-2037379.pdf?src-supplier=Digikey, Item Type=IC, Manufacturer Part Number=MAX662AESA+T, Pricing="1=7.55, 10=6.82, 50=6.51, 100=5.65, 1000=4.34, 10000=4.34 (USD)", RoHS=Yes, Stock=14227, Supplier=Mouser
U10: "Switching Controllers 12V or Adjustable, High-Efficiency, Low IQ, Step-Up DC-DC Controller", Manufacturer=Maxim, Supplier Part Number=700-MAX1771ESA, ComponentLink1Description=https://datasheet.ciiva.com/4877/max1771-100479-4877792.pdf?src-supplier=Mouser, ComponentLink1URL=https://datasheet.ciiva.com/4877/max1771-100479-4877792.pdf?src-supplier=Mouser, ComponentLink2Description=https://datasheet.ciiva.com/14150/max1771-eng-tds-14150776.pdf?src-supplier=Distrelec, ComponentLink2URL=https://datasheet.ciiva.com/14150/max1771-eng-tds-14150776.pdf?src-supplier=Distrelec, ComponentLink3Description=https://datasheet.ciiva.com/3217/max1771-3217307.pdf?src-supplier=Avnet, ComponentLink3URL=https://datasheet.ciiva.com/3217/max1771-3217307.pdf?src-supplier=Avnet, ComponentLink4Description=https://datasheet.ciiva.com/2016/max1771-2016789.pdf?src-supplier=Digikey, ComponentLink4URL=https://datasheet.ciiva.com/2016/max1771-2016789.pdf?src-supplier=Digikey, Item Type=IC, Manufacturer Part Number=MAX1771ESA+, Pricing="1=7.36, 10=6.33, 50=6.23, 100=5.5, 1000=4.19, 10000=4.19 (USD)", RoHS=Yes, Stock=3278, Supplier=Mouser
U11: "IC GATE NAND 4CH 2-INP 14SOIC", Case/Package=SOIC, High Level Output Current=-5.2mA, Low Level Output Current=5.2mA, Manufacturer="ON Semiconductor / Fairchild", Max Operating Temperature=85°C, Max Supply Voltage=6V, Min Operating Temperature=-40°C, Min Supply Voltage=2V, Operating Supply Voltage=2.5V, Quiescent Current=2uA, Voltage=5V, Channels=4, ComponentLink1Description=https://datasheet.ciiva.com/14100/mbmm74hc00-dat-en-14100074.pdf?src-supplier=Distrelec, ComponentLink1URL=https://datasheet.ciiva.com/14100/mbmm74hc00-dat-en-14100074.pdf?src-supplier=Distrelec, ComponentLink2Description=https://datasheet.ciiva.com/19477/786200-19477374.pdf?src-supplier=Jameco, ComponentLink2URL=https://datasheet.ciiva.com/19477/786200-19477374.pdf?src-supplier=Jameco, ComponentLink3Description=https://datasheet.ciiva.com/15090/getdatasheetpartid-44431-15090201.pdf?src-supplier=Verical, ComponentLink3URL=https://datasheet.ciiva.com/15090/getdatasheetpartid-44431-15090201.pdf?src-supplier=Verical, ComponentLink4Description=https://datasheet.ciiva.com/8248/mm74hc00-8248959.pdf?src-supplier=Avnet, ComponentLink4URL=https://datasheet.ciiva.com/8248/mm74hc00-8248959.pdf?src-supplier=Avnet, ComponentLink5Description=https://datasheet.ciiva.com/1862/mm74hc00-1862378.pdf?src-supplier=Digikey, ComponentLink5URL=https://datasheet.ciiva.com/1862/mm74hc00-1862378.pdf?src-supplier=Digikey, Height=1.5mm, Item Type=IC, Lead Free="Lead Free", Length=8.75mm, Logic Function="NAND GATE", Manufacturer Part Number=MM74HC00M, Mounting Technology="Surface Mount", Nominal Supply Voltage=6V, Number of Circuits=4, Number of Elements=4, Number of Gates=4, Number of Inputs=2, Number of Outputs=1, Output Current=5.2mA, Packaging=Rail/Tube, Pins=14, Pricing="3847=0.1924, 3900=0.1872, 7700=0.182, 20000=0.1768, 39000=0.1716, 200000=0.1664, 390000=0.1612 (USD)", Propagation Delay=15ns, Radiation Hardening=No, Reach SVHC Compliant=No, RoHS=Yes, RoHS Compliant=Yes, Series=74HC, Stock=5775, Supplier=Avnet, Supplier Part Number=MM74HC00M, Technology=CMOS, Turn-On Delay Time=90ns, Width=4mm
U14: "IC REG CHRG PUMP ADJ 200MA 8SOIC", Manufacturer=Maxim, Supplier Part Number=700-MAX889RESA, ComponentLink1Description=https://datasheet.ciiva.com/30477/0900766b81253d0c-30477617.pdf?src-supplier=Rs, ComponentLink1URL=https://datasheet.ciiva.com/30477/0900766b81253d0c-30477617.pdf?src-supplier=Rs, ComponentLink2Description=https://datasheet.ciiva.com/3215/max889-3215733.pdf?src-supplier=Avnet, ComponentLink2URL=https://datasheet.ciiva.com/3215/max889-3215733.pdf?src-supplier=Avnet, ComponentLink3Description=https://datasheet.ciiva.com/4874/max889-4874923.pdf?src-supplier=Mouser, ComponentLink3URL=https://datasheet.ciiva.com/4874/max889-4874923.pdf?src-supplier=Mouser, ComponentLink4Description=https://datasheet.ciiva.com/2028/max889-2028980.pdf?src-supplier=Digikey, ComponentLink4URL=https://datasheet.ciiva.com/2028/max889-2028980.pdf?src-supplier=Digikey, Item Type=IC, Manufacturer Part Number=MAX889RESA+, Pricing="1=6.21, 10=5.28, 50=5.28, 100=4.56, 1000=3.28, 10000=3.11 (USD)", RoHS=Yes, Stock=621, Supplier=Mouser
U17: "IC TRANSCEIVER FULL 1/1 14SOIC", Manufacturer=Maxim, Supplier Part Number=700-MAX3080ECSD, ComponentLink1Description=https://datasheet.ciiva.com/3028/max3080e-max3089e-3028432.pdf?src-supplier=Avnet, ComponentLink1URL=https://datasheet.ciiva.com/3028/max3080e-max3089e-3028432.pdf?src-supplier=Avnet, ComponentLink2Description=https://datasheet.ciiva.com/30478/0900766b811dea3c-30478288.pdf?src-supplier=Rs, ComponentLink2URL=https://datasheet.ciiva.com/30478/0900766b811dea3c-30478288.pdf?src-supplier=Rs, ComponentLink3Description=https://datasheet.ciiva.com/14429/max3080e-max3089e-14429944.pdf?src-supplier=Avnet, ComponentLink3URL=https://datasheet.ciiva.com/14429/max3080e-max3089e-14429944.pdf?src-supplier=Avnet, ComponentLink4Description=https://datasheet.ciiva.com/1712/max3080e-max3089e-1712792.pdf?src-supplier=Digikey, ComponentLink4URL=https://datasheet.ciiva.com/1712/max3080e-max3089e-1712792.pdf?src-supplier=Digikey, ComponentLink5Description=https://datasheet.ciiva.com/1503/74602-1503433.pdf?src-supplier=Element14, ComponentLink5URL=https://datasheet.ciiva.com/1503/74602-1503433.pdf?src-supplier=Element14, Item Type=IC, Manufacturer Part Number=MAX3080ECSD+, Pricing="1=5.09, 10=4.32, 50=4.32, 100=3.74, 1000=2.68, 10000=2.55 (USD)", RoHS=Yes, Stock=531, Supplier=Mouser

## Free pads (board coordinates)
  round 150 hole 125: MH(-6,-16) MH(-6,3607) MH(5053,-16) MH(5054,3607) MH(5998,-16) MH(6000,3607)
  round 250 hole 125: MH(2279,240) MH(2279,3140) MH(5654,90) MH(5654,3239)

## Via types
v1: diameter 23.62, hole 11.81, Top Layer to Bottom Layer, 262 vias

## Nets (pads, with @x,y where several pads share a name; then routed paths per layer and width w, separated by ;. In a path a pad name is that pad's centre, name@x,y a point inside that pad or via, vN(x,y) a via of type N, cw(c..) or ccw(c..) an arc to the next point about the centre after c; other vN are vias at no path point)
+5V: C5.1 C6.1 C7.2 C8.2 C9.2 C17.2 C18.2 C20.2 C21.2 C22.2 C27.2 C28.2 C38.1 C43.2 C45.1 J1.6 J1.58 J3.4 J9.10 J13.2 J23.2 R10.1 R18.1 R20.2 R21.2 R31.2 R32.1 R33.1 R34.1 R35.1 R36.1 R37.1 R38.1 R39.1 U2.4 U2.5 U4.10 U4.19 U4.26 U4.38 U4.57 U8.16 U9.5 U10.2 U13.1 U13.2 U13.3 U15.1 U15.2 U15.3 U17.4 U17.14 | length 1661.7
  Top Layer w8: C17.2@4340.84,831.16 C17.2@4342,830
  Top Layer w10: C22.2@4036,1165 4041.21,1170.21 U4.38@4114.77,1170.21 4130.49,1170.21 4131,1170.72 4131.72,1170 4161,1170 4161.38,1169.62 v1@4161.38,1169.27 ; C21.2@4308,1414 4308.47,1413.53 U4.26@4308.47,1344.23 ; C17.2@4347.84,831.16 U4.57@4347.84,897.77 ; C18.2@4446,1414 4446.27,1413.73 U4.19@4446.27,1344.23 ; v1(4464,1167) 4504,1167 4520.47,1150.53 U4.10@4561.23,1150.53 4622,1150.53 4632,1140.53 C9.2@4632,1139
  Top Layer w20: C45.1@2862.88,2120.44 2862.88,2211.82 2863,2211.95 v1(2863,2274) ; U9.5@3799.3,2506 C43.2@3866,2506 ; v1(3867,2461) C43.2@3867,2505
  Top Layer w25: v1(3158,619) U17.14@3158,667.3 ; U17.4@3308,454.7 v1(3308,509) ; v1(3313,379) C20.2@3347,379 C20.2@3346,378 ; R21.2@3495,1386 v1@3534.34,1386 ; R31.2@3503,982 3504,983 v1(3538,983) ; v1(3972,2799) R33.1@3972,2835 ; R18.1@3976,1213.5 R20.2@3976,1264 3976.5,1264.5 3976.5,1318.5 v1(3977,1319) ; v1(4055.57,2799) R39.1@4055.57,2835 ; v1(4140.14,2799) R34.1@4140.14,2835 ; v1(4219.71,2799) R38.1@4219.71,2835 ; v1(4268,1413.53) C21.2@4308.47,1413.53 ; v1(4304.29,2799) R35.1@4304.29,2835 ; v1(4342,799) C17.2@4342,830 ; v1(4385,2799) R37.1@4385,2835 ; v1(4409,1414) C18.2@4446,1414 ; v1(4470,2799) R36.1@4470,2835 ; v1(4550,2799) R32.1@4550,2835 ; v1(4632,1102) C9.2@4632,1138
  Top Layer w50: R10.1@5006,422 5123,422 J13.2@5124,423 J13.2@5124.5,423.5 ; C38.1@5083.01,2873.99 C38.1@5087,2870 ; J1.6@5347.47,3026.53 J1.6@5350,3024 ; J1.58@5349.5,423.5 J1.58@5350,424
  other v1: 5198,-49 5198,-15 5198,19 749,323 733,355 3648.06,615 3648.06,667 3143.31,896.01 3193.31,896.01 3243.31,896.01 4162.38,1169.27 3132.31,1303.71 3182.31,1303.71 3232.31,1303.71 3539.47,1385.87 4618,2059 4653,2059 4618,2261 4653,2261 4597,2308 5262,3359 5262,3393 5262,3427
+5V_MB: C34.1 J3.3 J6.3 J6.4 R45.2 U13.5 U13.6 U13.7 U13.8 U14.1 U14.6 | length 4941.6
  Top Layer w20: U14.1@2556,553.7 U14.1@2556,566
  Top Layer w25: 2542.62,523 2556,536.38 U14.1@2556,553.7 ; U14.1@2556,566 2556,610 v1(2606,660) 2656,710 U14.6@2656,766.3 ; R45.2@3040,732 v1(3077,732)
  Top Layer w40: J6.4@1077,65 1077,177 1423,523 2435.07,523 ; C34.1@2435.07,888 2435.07,523 ; 2542.62,523 2435.07,523 ; v1(3077,732) 3547,732 3593,778 v1(3832,778) ; v1(4129,676) 4226,676 4485,417 J3.3@4485,66
  Top Layer w50: J6.3@1077,-35 J6.4@1077,65
  Bottom Layer w40: v1(2606,660) 3005,660 v1(3077,732) ; v1(3832,778) 3957,778 4059,676 v1(4129,676)
+5VLEDS: C3.1 R1.2 R2.1 R3.1 U1.2 U1.4 U11.14 | length 908.9
  Top Layer w20: U11.14@28,2980.6 28.5,2980.1 28.5,2920.5 v1(29,2920) ; R3.1@238,2486 R2.1@238,2538 R1.2@238,2589 238.5,2589.5 238.5,2657.5 v1(239,2658)
  Top Layer w50: U1.2@442.55,2418 U1.4@442.55,2658.16
  Bottom Layer w20: v1(29,2920) 29,2753 64,2718 213,2718 239,2692 v1@239,2658.98
+9.9V: C32.1 D4.2 J14.1 J14.2 J14.3 J18.2 J19.1 J19.2 J19.3 J20.1 J20.2 J20.3 J21.2 R26.2 | length 311.1
  Top Layer w25: v1(109.39,707.17) 160.67,707.17 J14.1@161.17,707.67 ; v1@111,705.81 J14.2@151.89,664.91 ; v1(2293,2636) 2293,2585 2326,2552 C32.1@2327,2552 ; R26.2@2974,2122 2975,2123 v1(3009,2123)
  Top Layer w40: J21.2@-43.25,368.95 v1(23.95,368.95)
  other v1: 5793,363.26 5876.09,363.26 5793,402.63 5876.09,402.63 5793,442 5876.09,442 109.39,628.43 192.48,628.43 109.39,667.8 192.48,667.8 192.48,707.17 2295,2468 2327.5,2468 2360,2468 2325.5,2636 2358,2636 5793,2793.26 5876.09,2793.26 5793,2832.63 5876.09,2832.63 5793,2872 5876.09,2872
-5V_MB: C35.2 J6.11 J6.12 R29.1 U14.5 | length 1958
  Top Layer w25: C35.2@2688.07,888 2705.31,870.76 C35.2@2705.31,829.5 ; U14.5@2706,757 2706,808 C35.2@2706,829.5 ; 2730,731 2735.5,736.5 2735.5,737 2748.5,737 R29.1@2754,742.5 ; R29.1@2758.5,737 2761,734.5 R29.1@2761,732
  Top Layer w50: J6.11@1477,-35 J6.12@1477,65
  Bottom Layer w40: J6.12@1477,65 1477,328 1660,511 2164,511 2473,820 2695,820
  other v1: 2707,814 2676.76,965.38 2721.76,965.38
/CHRG: R1.1 U3.2 U11.1 U11.4 U11.5 | length 1356.8
  Top Layer w12: U11.1@28,2768 v1(28,2675) 28,2060 173.02,1914.98 U3.2@237.76,1914.98
  Top Layer w20: R1.1@178,2589 v1(178,2675) U11.4@178,2768 U11.5@228,2768
  Bottom Layer w20: v1(28,2675) v1(178,2675)
/FAULT: R2.2 U3.1 U11.2 U11.13 | length 1257.9
  Top Layer w12: U11.2@78,2768 78,2503 ; R2.2@178,2538 172.5,2532.5 107.5,2532.5 78,2503 ; U3.1@237.76,1940.57 174.3,1940.57 78,2036.87 78,2503
  Top Layer w20: U11.2@78,2768 U11.13@78,2980.6
/RDY: R3.2 U3.16 | length 796.6
  Top Layer w20: v1(178,2448) R3.2@178,2486 ; v1(421,1940) 421.28,1940.28 457.95,1940.28 U3.16@458.24,1940.57
  Bottom Layer w20: v1(178,2448) 178,1991 229,1940 v1(421,1940)
A4: U11.6 U11.12 | length 339.2
  Top Layer w20: U11.12@128,2980.6 128,2895 150,2873 260,2873 278,2855 U11.6@278,2768
BATSENSE: R8.2 R9.2 U4.24 | length 961.9
  Top Layer w10: R9.2@4094,2146 4094,1783 4347.84,1529.16 U4.24@4347.84,1344.23
  Top Layer w25: R9.2@4094,2146 R8.2@4094,2201
BATT+: C2.1 J4.2 J4.4 R6.1 R11.1 R27.1 U3.10 U7.1 U7.2 U7.3 | length 7735
  Top Layer w12: U3.10@458.24,1787.02 487.97,1787.02 495,1779.99 v1(495,1639)
  Top Layer w40: -6,1663.38 R6.1@-6,1754 ; 17.43,1639.95 301.05,1639.95 v1(302,1639) ; R27.1@3454,1704 v1(3511,1704) 3552,1704 3605,1651 3605,1598
  Top Layer w150: v1(302,1639) 302.14,1638.86 302.14,735.86 391,647 1736.53,647 1919,829.47 1919,2713 J4.4@1605.53,3026.47 ; J4.4@1597,3026.47 J4.2@1597,3243
  Bottom Layer w40: v1(1927,1704) v1(3511,1704)
  Bottom Layer w50: v1(302,1639) v1(495,1639)
BCKBATT+: J2.3 J22.2 J24.1
BCKBATT-: J2.7 J22.1 J24.2
DC_IN: J5.3 J5.4 J15.2 | length 1084
  Top Layer w50: J15.2@445,3559 445,3461 523,3383 983.6,3383 J5.3@1124,3242.6 J5.4@1124,3026.07
DCIN: D1.1 D1.3 R16.2 R41.1 U1.3 | length 3747.9
  Top Layer w40: R41.1@2809,1239 2809,1404 2836,1431 R16.2@2889,1431
  Top Layer w50: D1.1@929,2594.04 941,2606.04 941,2756 992,2807 v1(1533,2807) ; v1(2212,1800) 2212,1334 2307,1239 R41.1@2809,1239
  Bottom Layer w50: v1(1533,2807) 2081,2807 2212,2676 v1(2212,1800)